# Altium PCB MiniPC.PcbDoc (part 13 of 24)
Units mm, origin at the board's own origin, x right, y up, seen from the top; angles counter-clockwise.
Board outline 175 x 155 mm, 16 copper layers (1_Top, 2_int1_(gnd), 3_int2_(power), 4_int3_(gnd), 5_int4_(sign), 6_int5_(power), 7_int6_(sign), 8_int7_(power), 9_int8_(gnd), 10_int9_(sign), 11_int10_(gnd), 12_int11_(sign), 13_int12_(gnd), 14_int13_(power), 15_int14_(gnd), 16_Bottom), stack 2.008 mm thick; 1046 components, 837 nets, 6010 pads, 4009 vias.
Unrouted connection lines stored in the file: 564.
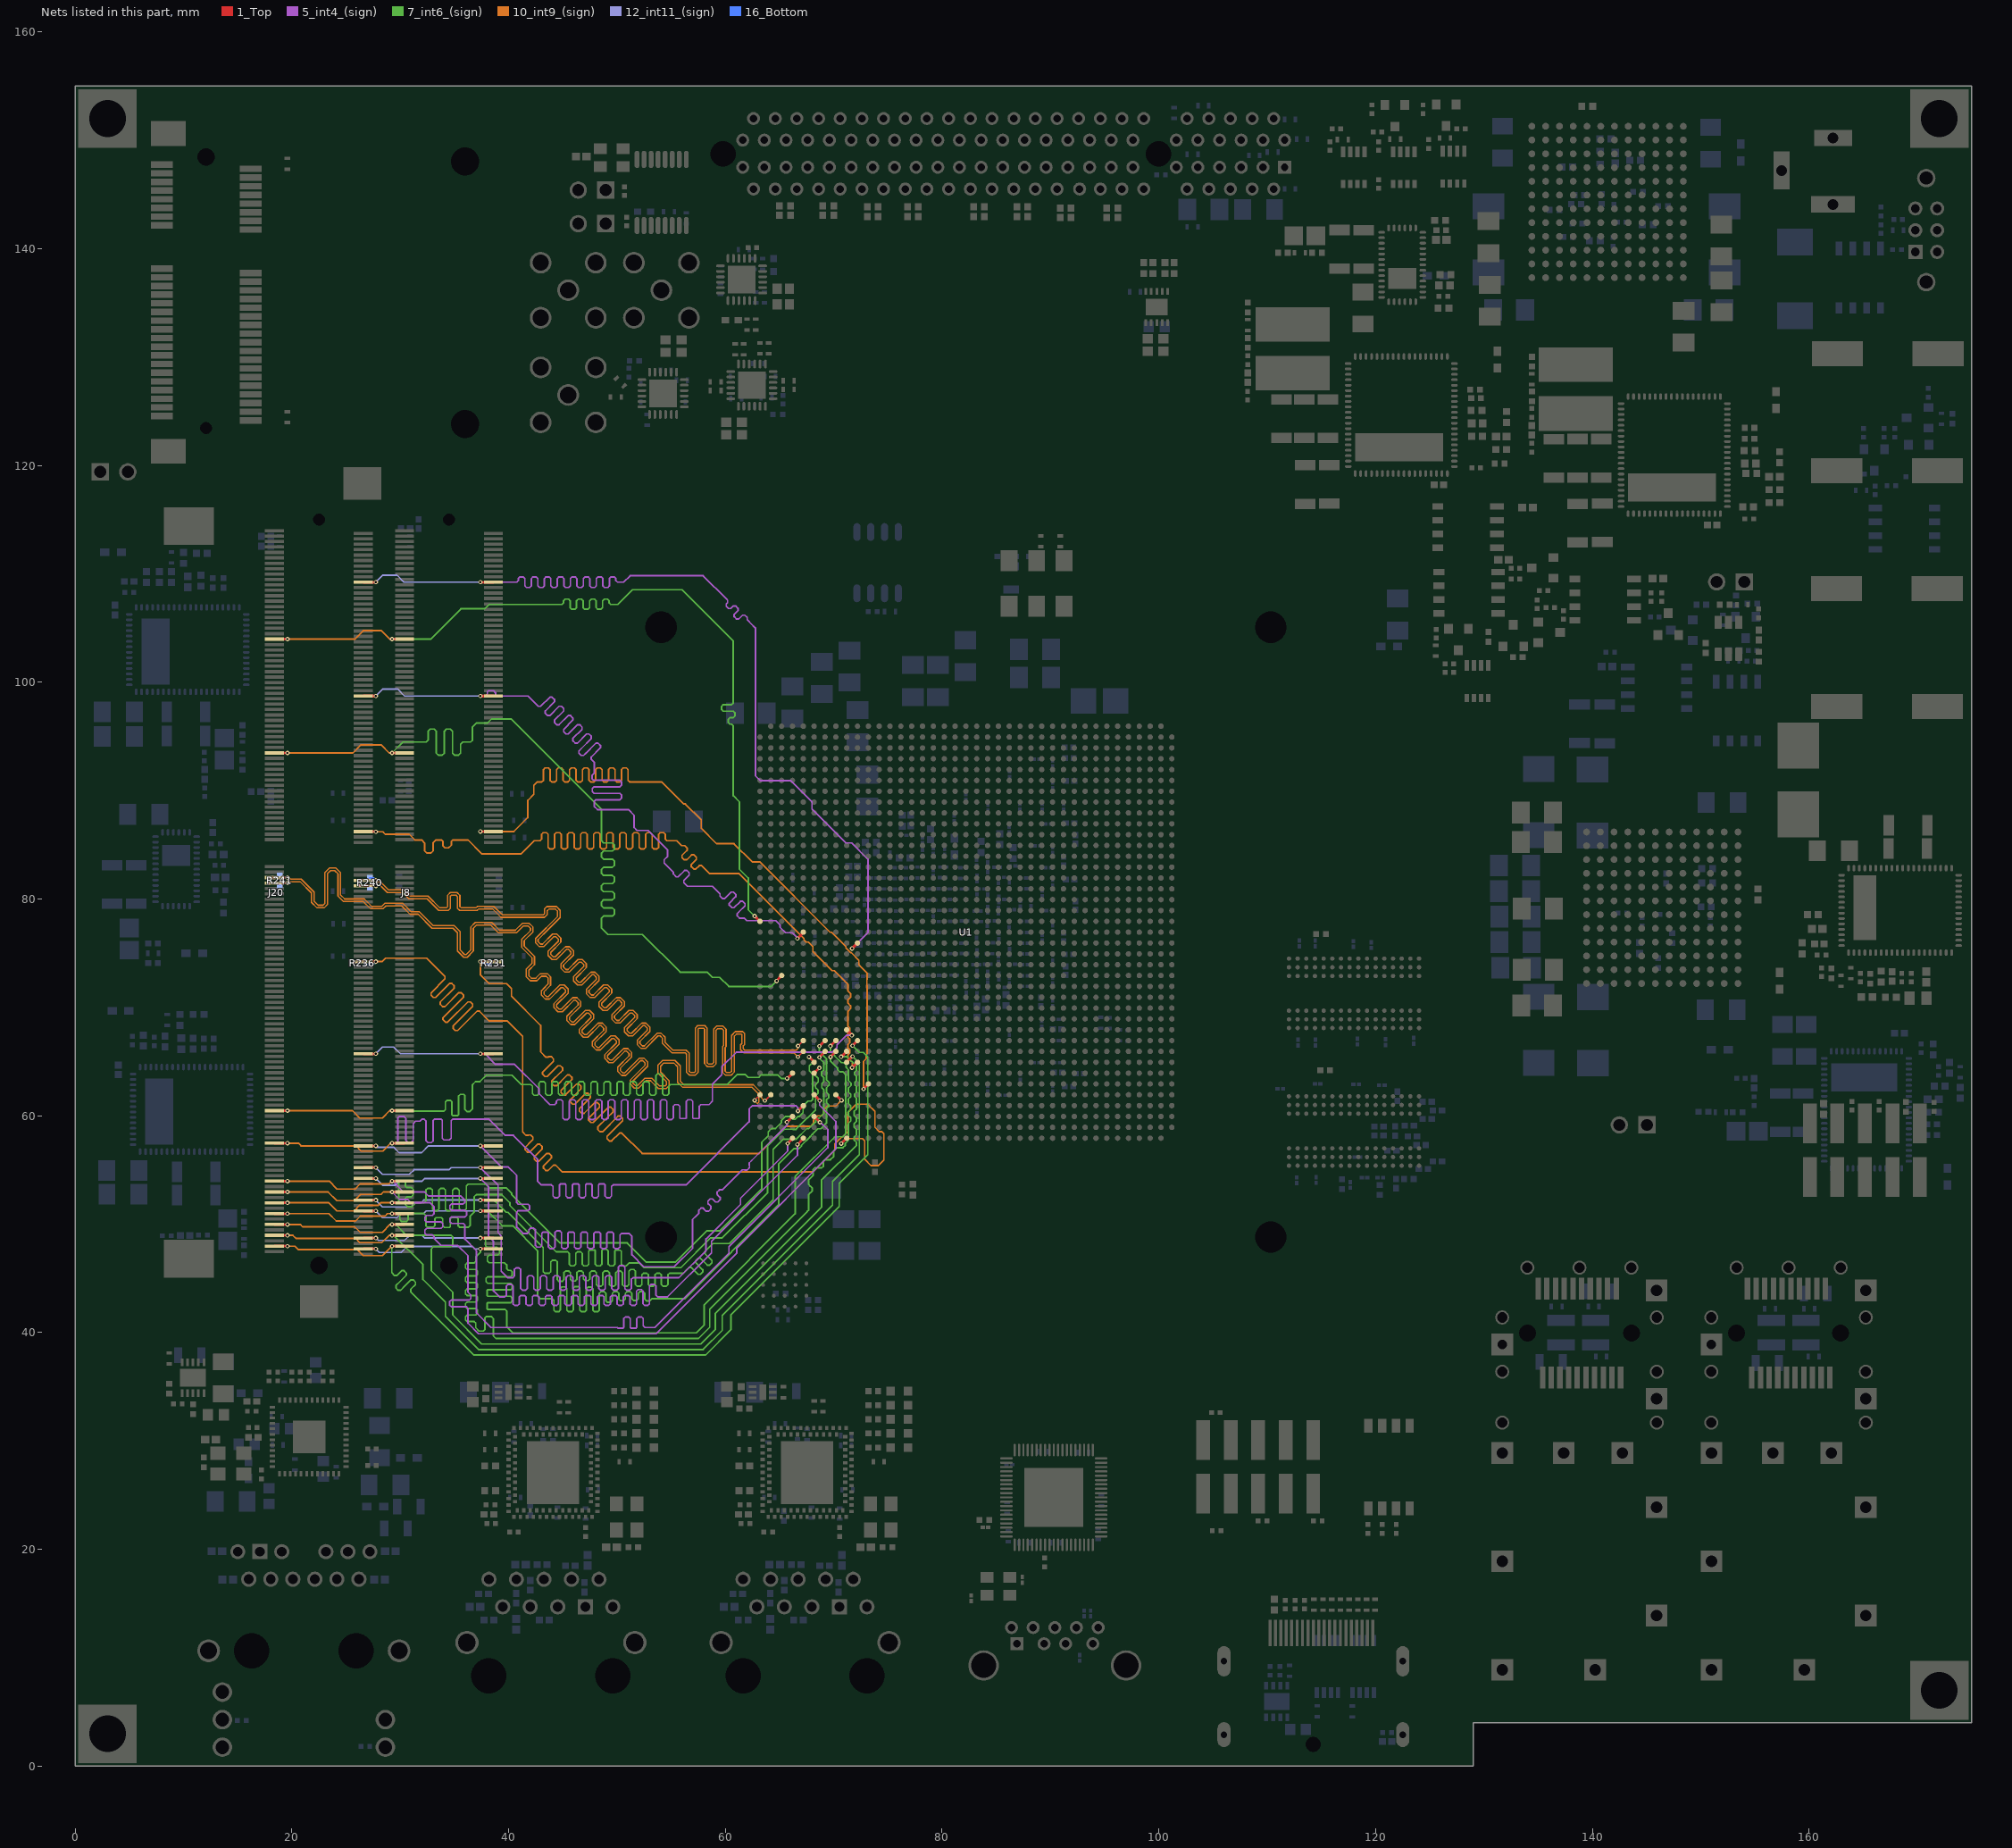
[diagram p25: the nets of this part, all layers, seen from the top]

## Via types
v1: diameter 0.4, hole 0.2, 1_Top to 16_Bottom, tented both sides, 1658 vias
v2: diameter 0.5, hole 0.2, 1_Top to 16_Bottom, tented both sides, 1014 vias
v3: diameter 0.7, hole 0.3, 1_Top to 16_Bottom, tented both sides, 915 vias
v4: diameter 0.6, hole 0.2, 1_Top to 16_Bottom, tented both sides, 278 vias
v5: diameter 0.4, hole 0.2, 1_Top to 16_Bottom, 93 vias
v6: diameter 0.4/0/0/0/0/0/0/0/0/0/0/0/0/0/0/0.4 (per signal layer), hole 0.2, 1_Top to 16_Bottom, tented both sides, 18 vias
v7: diameter 0.4/0/0/0/0/0/0/0/0/0/0/0.4/0.4/0.4/0.4/0.4 (per signal layer), hole 0.2, 1_Top to 16_Bottom, tented both sides, 16 vias
v8: diameter 0.5, hole 0.254, 1_Top to 16_Bottom, tented both sides, 15 vias
v9: diameter 0.5, hole 0.2, 1_Top to 16_Bottom, 2 vias

## Nets (pads, with @x,y where several pads share a name; then routed paths per layer and width w, separated by ;. In a path a pad name is that pad's centre, name@x,y a point inside that pad or via, vN(x,y) a via of type N, cw(c..) or ccw(c..) an arc to the next point about the centre after c; other vN are vias at no path point) (continued)
DDR4_SODIMM_CK2_N: J20.139 R240.2 U1.AK5 | length 103.1
  1_Top w0.15: J20.139@26.6,81.725 v1(27.75,81.725) ; v1(66.7,66.445) U1.AK5@67.194,66.939
  10_int9_(sign) w0.13: v1(27.75,81.725) 27.891,81.584 28.174,81.584 28.919,80.84 30.324,80.84 30.899,80.265 32.574,80.265 33.657,79.182 34.265,79.182 34.277,79.182 34.394,79.299 34.394,80.368 34.625,80.599 35.25,80.599 35.512,80.337 35.512,79.299 35.629,79.182 35.636,79.182 37,79.182 37.147,79.33 38.62,79.33 39.4,78.55 43.225,78.55 43.325,78.65 43.325,79.1 43.525,79.3 44.424,79.3 44.765,78.959 44.765,78.299 43.649,77.183 42.722,76.256 42.722,76.062 42.945,75.839 43.139,75.839 44.066,76.766 44.459,76.766 44.823,76.402 44.823,76.009 43.896,75.082 43.896,74.888 44.119,74.665 44.313,74.665 45.24,75.592 45.633,75.592 45.997,75.228 45.997,74.835 45.07,73.908 45.07,73.714 45.293,73.491 45.487,73.491 46.414,74.418 46.807,74.418 47.17,74.055 47.17,73.662 46.243,72.735 46.243,72.541 46.467,72.317 46.661,72.317 47.588,73.244 47.981,73.244 48.344,72.881 48.344,72.488 47.417,71.561 47.417,71.367 47.64,71.144 47.834,71.144 48.761,72.071 49.154,72.071 49.518,71.707 49.518,71.314 48.591,70.387 48.591,70.193 48.814,69.97 49.008,69.97 49.935,70.897 50.328,70.897 50.692,70.533 50.692,70.14 49.765,69.213 49.765,69.019 49.988,68.796 50.182,68.796 51.109,69.723 51.502,69.723 51.866,69.359 51.866,68.966 50.939,68.039 50.939,67.845 51.162,67.622 51.356,67.622 52.283,68.549 52.676,68.549 53.039,68.186 53.039,67.793 52.112,66.866 52.112,66.672 52.335,66.448 52.53,66.448 53.689,67.608 54.082,67.608 54.445,67.244 54.445,66.78 55.163,66.062 56.385,66.062 56.663,65.785 56.663,64.122 56.8,63.985 57.116,63.985 57.253,64.122 57.253,65.9 57.253,68.117 57.451,68.315 58.099,68.315 58.323,68.092 58.323,64.903 58.46,64.765 58.776,64.765 58.913,64.903 58.913,66.225 58.913,68.002 59.201,68.29 59.774,68.29 60.065,67.999 60.065,66.383 59.983,66.301 59.983,64.122 60.12,63.985 60.436,63.985 60.573,64.122 60.573,66.45 60.573,67.424 60.913,67.765 61.599,67.765 61.765,67.599 61.765,66.58 61.643,66.458 61.643,66.2 61.78,66.062 66.545,66.062 66.7,66.217 v1(66.7,66.445)
  16_Bottom w0.15: R240.2@27.2,81.925 27.55,81.925 v1(27.75,81.725)
DDR4_SODIMM_CK2_P: J20.137 R240.1 U1.AL5 | length 103
  1_Top w0.15: J20.137@26.6,81.225 26.625,81.25 26.671,81.204 v1(27.751,81.204) ; v1(66.694,65.439) U1.AL5@67.194,65.939
  10_int9_(sign) w0.13: v1(27.751,81.204) 27.892,81.344 28.075,81.344 28.819,80.6 30.225,80.6 30.8,80.025 32.475,80.025 33.558,78.942 34.441,78.942 34.634,79.135 34.634,80.269 34.725,80.359 35.151,80.359 35.272,80.238 35.272,79.155 35.485,78.942 37.099,78.942 37.247,79.09 38.521,79.09 39.301,78.31 43.324,78.31 43.565,78.551 43.565,78.91 43.715,79.06 44.325,79.06 44.525,78.86 44.525,78.398 42.482,76.355 42.482,75.963 42.846,75.599 43.239,75.599 44.166,76.526 44.36,76.526 44.583,76.303 44.583,76.109 43.656,75.182 43.656,74.789 44.019,74.425 44.412,74.425 45.339,75.352 45.534,75.352 45.757,75.129 45.757,74.935 44.83,74.008 44.83,73.615 45.193,73.251 45.586,73.251 46.513,74.178 46.707,74.178 46.93,73.955 46.93,73.761 46.003,72.834 46.003,72.441 46.367,72.077 46.76,72.077 47.687,73.004 47.881,73.004 48.104,72.781 48.104,72.587 47.177,71.66 47.177,71.267 47.541,70.904 47.934,70.904 48.861,71.831 49.055,71.831 49.278,71.608 49.278,71.413 48.351,70.486 48.351,70.094 48.715,69.73 49.108,69.73 50.035,70.657 50.229,70.657 50.452,70.434 50.452,70.24 49.525,69.313 49.525,68.92 49.888,68.556 50.281,68.556 51.208,69.483 51.402,69.483 51.626,69.26 51.626,69.066 50.699,68.139 50.699,67.746 51.062,67.382 51.455,67.382 52.382,68.309 52.576,68.309 52.799,68.086 52.799,67.892 51.872,66.965 51.872,66.572 52.236,66.208 52.629,66.208 53.788,67.368 53.982,67.368 54.205,67.144 54.205,66.68 55.063,65.822 56.286,65.822 56.423,65.685 56.423,64.023 56.701,63.745 57.215,63.745 57.493,64.023 57.493,65.9 57.493,68.018 57.55,68.075 58,68.075 58.083,67.992 58.083,64.803 58.361,64.525 58.875,64.525 59.153,64.803 59.153,66.225 59.153,67.903 59.3,68.05 59.675,68.05 59.825,67.9 59.825,66.482 59.743,66.4 59.743,64.023 60.021,63.745 60.535,63.745 60.813,64.023 60.813,66.45 60.813,67.325 61.013,67.525 61.5,67.525 61.525,67.5 61.525,66.68 61.403,66.558 61.403,66.1 61.681,65.822 66.311,65.822 v1(66.694,65.439)
  16_Bottom w0.15: R240.1@27.2,81.075 27.329,81.204 v1(27.751,81.204)
DDR4_SODIMM_CK3_N: J20.140 R241.2 U1.AR2 | length 103.1
  1_Top w0.15: J20.140@18.4,81.975 v1(19.602,81.975) ; v1(63.65,61.4) 63.655,61.4 U1.AR2@64.194,61.939
  10_int9_(sign) w0.13: v1(19.602,81.975) 19.765,81.975 19.9,81.84 20.86,81.84 22.05,80.65 22.05,79.8 22.425,79.425 22.885,79.425 23.06,79.6 23.06,82.449 23.476,82.865 24.06,82.865 24.5,82.425 24.5,80.375 24.875,80 26.7,80 27.361,79.339 28.314,79.339 28.585,79.61 30.229,79.61 30.999,78.84 31.749,78.84 33.045,77.545 34.974,77.545 35.525,76.994 35.525,75.3 35.95,74.875 36.086,74.875 36.504,75.294 36.504,77.404 36.94,77.84 38.449,77.84 39.174,77.115 40.626,77.115 41.276,77.765 41.899,77.765 42.258,77.407 42.258,76.983 41.439,76.164 41.439,75.65 42.39,74.699 42.39,73.94 41.875,73.425 41.875,72.925 42.1,72.7 42.511,72.7 42.926,73.115 43.574,73.115 43.875,72.814 43.875,72.05 43.425,71.6 43.425,71.589 43.264,71.428 43.264,71.234 43.487,71.011 43.681,71.011 44.739,72.068 45.132,72.068 45.495,71.705 45.495,71.312 44.438,70.254 44.438,70.06 44.661,69.837 44.855,69.837 45.913,70.894 46.306,70.894 46.669,70.531 46.669,70.138 45.612,69.08 45.612,68.886 45.835,68.663 46.029,68.663 47.086,69.721 47.479,69.721 47.843,69.357 47.843,68.964 46.786,67.907 46.786,67.713 47.009,67.489 47.203,67.489 48.26,68.547 48.653,68.547 49.017,68.183 49.017,67.79 47.959,66.733 47.959,66.539 48.182,66.316 48.377,66.316 49.434,67.373 49.827,67.373 50.191,67.009 50.191,66.616 49.133,65.559 49.133,65.365 49.356,65.142 49.55,65.142 50.608,66.199 51.001,66.199 51.364,65.836 51.364,65.443 50.307,64.385 50.307,64.191 50.53,63.968 50.724,63.968 52.085,65.328 52.477,65.328 52.841,64.965 52.841,64.572 51.481,63.211 51.481,63.017 51.704,62.794 51.898,62.794 52.576,63.472 53.203,63.472 53.925,62.75 54.45,62.75 54.575,62.875 54.575,63.136 53.778,63.932 53.778,64.674 54.219,65.115 55.349,65.115 55.84,64.624 55.84,63.2 56.175,62.865 62.574,62.865 63.315,62.124 63.315,61.675 63.59,61.4 v1(63.65,61.4)
  16_Bottom w0.15: R241.2@18.9,82.125 19.05,81.975 v1(19.602,81.975)
DDR4_SODIMM_CK3_P: J20.138 R241.1 U1.AR1 | length 103.2
  1_Top w0.15: J20.138@18.4,81.475 v1(19.602,81.475) ; v1(62.7,61.425) 62.7,61.445 U1.AR1@63.194,61.939
  10_int9_(sign) w0.13: v1(19.602,81.475) 19.727,81.6 20.761,81.6 21.81,80.551 21.81,79.701 22.326,79.185 22.984,79.185 23.3,79.501 23.3,82.35 23.575,82.625 23.961,82.625 24.26,82.326 24.26,80.276 24.776,79.76 26.601,79.76 27.262,79.099 28.413,79.099 28.684,79.37 30.13,79.37 30.9,78.6 31.65,78.6 32.945,77.305 34.875,77.305 35.285,76.895 35.285,75.201 35.851,74.635 36.185,74.635 36.744,75.194 36.744,77.305 37.039,77.6 38.35,77.6 39.075,76.875 40.725,76.875 41.375,77.525 41.8,77.525 42.018,77.307 42.018,77.082 41.199,76.264 41.199,75.551 42.15,74.6 42.15,74.039 41.635,73.524 41.635,72.826 42.001,72.46 42.61,72.46 43.025,72.875 43.475,72.875 43.635,72.715 43.635,72.149 43.185,71.699 43.185,71.688 43.024,71.527 43.024,71.134 43.388,70.771 43.781,70.771 44.838,71.828 45.032,71.828 45.255,71.605 45.255,71.411 44.198,70.354 44.198,69.961 44.562,69.597 44.955,69.597 46.012,70.654 46.206,70.654 46.429,70.431 46.429,70.237 45.372,69.18 45.372,68.787 45.735,68.423 46.128,68.423 47.186,69.481 47.38,69.481 47.603,69.258 47.603,69.063 46.546,68.006 46.546,67.613 46.909,67.249 47.302,67.249 48.36,68.307 48.554,68.307 48.777,68.084 48.777,67.89 47.719,66.832 47.719,66.439 48.083,66.076 48.476,66.076 49.533,67.133 49.727,67.133 49.951,66.91 49.951,66.716 48.893,65.658 48.893,65.265 49.257,64.902 49.65,64.902 50.707,65.959 50.901,65.959 51.124,65.736 51.124,65.542 50.067,64.485 50.067,64.092 50.431,63.728 50.824,63.728 52.184,65.088 52.378,65.088 52.601,64.865 52.601,64.671 51.241,63.311 51.241,62.918 51.604,62.554 51.997,62.554 52.675,63.232 53.104,63.232 53.826,62.51 54.549,62.51 54.815,62.776 54.815,63.235 54.018,64.032 54.018,64.575 54.318,64.875 55.25,64.875 55.6,64.525 55.6,63.101 56.076,62.625 62.475,62.625 63.075,62.025 63.075,61.25 62.95,61.125 62.7,61.375 v1(62.7,61.425)
  16_Bottom w0.15: R241.1@18.9,81.275 19.1,81.475 v1(19.602,81.475)
DDR4_SODIMM_CKE0: J8.109 R231.2 U1.AR8 | length 75.3
  1_Top w0.25: v1(37.398,74.225) J8.109@38.6,74.225 ; U1.AR8@70.194,61.939 70.708,61.425 v1(70.725,61.425)
  10_int9_(sign) w0.15: v1(37.398,74.225) 37.398,73.002 38.2,72.2 39.805,72.2 40.265,71.74 40.265,71.035 42.965,68.335 42.965,65.885 43.444,65.406 43.656,65.406 43.716,65.467 43.929,65.467 44.141,65.255 44.141,65.043 43.143,64.045 43.143,63.833 43.355,63.621 43.567,63.621 44.565,64.619 44.777,64.619 44.989,64.407 44.989,64.194 44.822,64.028 43.991,63.196 43.991,62.984 44.203,62.772 44.415,62.772 45.247,63.603 45.414,63.77 45.626,63.77 45.838,63.558 45.838,63.346 45.671,63.179 44.84,62.348 44.84,62.136 45.052,61.923 45.264,61.923 46.262,62.922 46.474,62.922 46.686,62.709 46.686,62.497 46.519,62.331 45.688,61.499 45.688,61.287 45.9,61.075 46.112,61.075 46.944,61.906 47.111,62.073 47.323,62.073 47.535,61.861 47.535,61.649 47.368,61.482 46.537,60.651 46.537,60.439 46.749,60.226 46.961,60.226 47.959,61.225 48.171,61.225 48.383,61.012 48.383,60.8 48.217,60.633 47.385,59.802 47.385,59.59 47.597,59.378 47.809,59.378 48.641,60.209 49.224,60.793 49.436,60.793 49.648,60.58 49.648,60.368 49.065,59.785 48.234,58.954 48.234,58.741 48.446,58.529 48.658,58.529 50.106,59.977 50.318,59.977 50.53,59.765 50.53,59.553 49.914,58.936 49.082,58.105 49.082,57.893 49.294,57.681 49.507,57.681 50.232,58.406 50.444,58.406 52.325,56.525 63.125,56.525 65.1,58.5 65.1,58.6 65.525,59.025 67.855,59.025 68.125,59.295 68.125,59.6 68.525,60 68.855,60 69.075,60.22 69.075,60.55 69.425,60.9 70.2,60.9 v1(70.725,61.425)
  16_Bottom w0.25: v1(37.398,74.225) 37.523,74.1 R231.2@38.175,74.1
DDR4_SODIMM_CKE1: J20.109 R236.2 U1.AW9 | length 103.2
  1_Top w0.25: J20.109@26.6,74.225 v1(27.75,74.225) ; v1(70.694,57.439) U1.AW9@71.194,57.939
  10_int9_(sign) w0.15: v1(27.75,74.225) 28.325,74.225 28.65,74.55 32.425,74.55 34.131,72.844 34.131,72.632 32.846,71.347 32.846,71.135 33.058,70.923 33.271,70.923 34.555,72.208 34.767,72.208 34.98,71.995 34.98,71.783 33.695,70.498 33.695,70.286 33.907,70.074 34.119,70.074 35.404,71.359 35.616,71.359 35.828,71.147 35.828,70.935 33.956,69.062 33.956,68.85 34.168,68.638 34.38,68.638 36.252,70.51 36.465,70.51 36.677,70.298 36.677,70.086 34.881,68.291 34.881,68.079 35.093,67.866 35.305,67.866 37.101,69.662 37.313,69.662 38.225,68.75 39.9,68.75 41.3,67.35 41.3,58.5 41.594,58.206 41.806,58.206 41.826,58.227 42.038,58.227 42.25,58.015 42.25,57.802 42.124,57.676 41.523,57.075 41.523,56.863 41.735,56.651 41.947,56.651 42.548,57.252 42.674,57.378 42.887,57.378 43.099,57.166 43.099,56.954 42.972,56.828 42.371,56.227 42.371,56.014 42.584,55.802 42.796,55.802 43.397,56.403 43.523,56.53 43.735,56.53 43.947,56.317 43.947,56.105 43.821,55.979 43.22,55.378 43.22,55.166 43.432,54.954 43.644,54.954 44.139,55.449 44.351,55.449 44.98,54.82 68.074,54.82 70.125,56.87 70.125,57.45 70.739,58.064 70.849,58.064 71.3,58.515 71.3,60.3 72.075,61.075 73.125,61.075 73.8,60.4 73.8,58.95 74.225,58.525 74.45,58.525 74.625,58.35 74.625,55.925 74.1,55.4 73.45,55.4 72.85,56 72.85,57.7 72.65,57.9 71.155,57.9 v1(70.694,57.439)
  16_Bottom w0.25: R236.2@26.95,74.1 27.625,74.1 v1(27.75,74.225)
DDR4_SODIMM_CS0: J8.149 U1.AP11 | length 75.4
  1_Top w0.25: v1(37.398,86.225) J8.149@38.6,86.225 ; v1(72.75,62.473) 72.75,62.496 U1.AP11@73.194,62.939
  10_int9_(sign) w0.15: v1(37.398,86.225) 40.492,86.225 41.771,87.504 41.771,89.096 42.325,89.65 42.325,90.475 42.65,90.8 43.075,90.8 43.225,90.95 43.225,91.944 43.375,92.094 43.675,92.094 43.825,91.944 43.825,90.95 43.975,90.8 44.275,90.8 44.425,90.95 44.425,91.944 44.575,92.094 44.875,92.094 45.025,91.944 45.025,90.95 45.175,90.8 45.475,90.8 45.625,90.95 45.625,91.944 45.775,92.094 46.075,92.094 46.225,91.944 46.225,90.95 46.375,90.8 46.675,90.8 46.825,90.95 46.825,91.944 46.975,92.094 47.275,92.094 47.425,91.944 47.425,90.95 47.575,90.8 47.875,90.8 48.025,90.95 48.025,91.944 48.175,92.094 48.475,92.094 48.625,91.944 48.625,90.95 48.775,90.8 49.075,90.8 49.225,90.95 49.225,91.944 49.375,92.094 49.675,92.094 49.825,91.944 49.825,90.95 49.975,90.8 50.275,90.8 50.425,90.95 50.425,91.944 50.575,92.094 50.875,92.094 51.025,91.944 51.025,90.95 51.175,90.8 54.125,90.8 56.155,88.77 56.305,88.77 57.775,87.3 57.775,86.524 59.199,85.1 60.8,85.1 62.475,83.425 63.178,83.425 69.664,76.939 69.791,76.939 71.125,75.605 71.125,75.478 71.539,75.064 71.599,75.064 72.319,74.345 72.319,73.929 73.075,73.173 73.075,72.584 73.054,72.562 73.054,72.045 73.075,72.023 73.075,70.704 73.069,70.698 73.069,69.643 73.079,69.634 73.079,68.273 73.075,68.269 73.075,65.725 73,65.651 73,65.27 72.75,65.02 v1(72.75,62.473)
DDR4_SODIMM_CS1: J20.149 U1.AM10 | length 92.2
  1_Top w0.25: J20.149@26.6,86.225 26.625,86.25 26.671,86.204 v1(27.751,86.204) ; v1(71.694,64.439) U1.AM10@72.194,64.939
  10_int9_(sign) w0.15: v1(27.751,86.204) 28.396,86.204 28.625,85.975 30.825,85.975 31.35,85.45 31.975,85.45 32.25,85.175 32.25,84.45 32.45,84.25 32.85,84.25 33.05,84.45 33.05,85.2 33.3,85.45 33.8,85.45 33.95,85.3 33.95,84.9 34.125,84.725 34.475,84.725 34.725,84.975 34.725,85.325 34.85,85.45 36.25,85.45 37.525,84.175 41.175,84.175 42.375,85.375 42.9,85.375 43.05,85.525 43.05,85.975 43.2,86.125 43.5,86.125 43.65,85.975 43.65,84.775 43.8,84.625 44.1,84.625 44.25,84.775 44.25,85.975 44.4,86.125 44.7,86.125 44.85,85.975 44.85,84.775 45,84.625 45.3,84.625 45.45,84.775 45.45,85.975 45.6,86.125 45.9,86.125 46.05,85.975 46.05,84.775 46.2,84.625 46.5,84.625 46.65,84.775 46.65,85.975 46.8,86.125 47.1,86.125 47.25,85.975 47.25,84.775 47.4,84.625 47.7,84.625 47.85,84.775 47.85,85.975 48,86.125 48.3,86.125 48.45,85.975 48.45,84.775 48.6,84.625 48.9,84.625 49.05,84.775 49.05,85.975 49.2,86.125 49.5,86.125 49.65,85.975 49.65,84.775 49.8,84.625 50.1,84.625 50.25,84.775 50.25,85.975 50.4,86.125 50.7,86.125 50.85,85.975 50.85,84.775 51,84.625 51.3,84.625 51.45,84.775 51.45,85.975 51.6,86.125 51.9,86.125 52.05,85.975 52.05,84.775 52.2,84.625 52.5,84.625 52.65,84.775 52.65,85.975 52.8,86.125 53.1,86.125 53.25,85.975 53.25,84.775 53.4,84.625 53.7,84.625 53.85,84.775 53.85,85.975 54,86.125 54.3,86.125 54.45,85.975 54.45,85.525 54.6,85.375 55.525,85.375 55.979,84.921 56.045,84.921 56.257,84.921 56.469,84.709 56.469,84.496 56.436,84.464 56.012,84.039 56.012,83.827 56.224,83.615 56.436,83.615 56.861,84.039 56.893,84.072 57.106,84.072 57.318,83.86 57.318,83.648 57.285,83.615 56.861,83.191 56.861,82.979 57.073,82.767 57.285,82.767 57.603,83.085 57.815,83.085 58.56,82.34 61.265,82.34 67.25,76.355 67.25,76.245 67.47,76.025 67.655,76.025 68.075,75.605 68.075,75.175 69.865,73.385 70.04,73.385 71.319,72.106 71.319,71.506 71.55,71.275 71.55,70.931 71.319,70.7 71.319,70.381 71.55,70.15 71.55,69.881 71.319,69.65 71.319,69.269 71.3,69.25 71.3,68.275 71.475,68.1 71.475,67.8 71.3,67.625 71.3,67.25 71.478,67.072 71.478,66.753 71.35,66.626 ; 71.35,66.625 71.3,66.575 71.3,66.225 71.375,66.225 71.5,66.1 71.5,65.798 71.302,65.6 71.302,65.367 71.694,64.976 v1(71.694,64.439)
DDR4_SODIMM_DM0: J8.12 J20.12 U1.AL9 | length 87.5
  1_Top w0.25: J20.12@18.4,49.975 v1(19.602,49.975) ; v1(29.25,49.975) J8.12@30.4,49.975 ; v1(70.677,65.45) 70.705,65.45 U1.AL9@71.194,65.939
  7_int6_(sign) w0.15: v1(29.25,49.975) 29.575,49.975 30.575,48.975 34.7,48.975 34.85,48.825 34.85,48.125 34.65,47.925 33.075,47.925 32.875,47.725 32.875,45.7 34.85,43.725 34.85,41.629 37.524,38.955 57.744,38.955 59.07,40.281 59.07,41.745 68.875,51.55 68.875,54.05 72.104,57.279 72.104,57.55 72.1,57.55 71.875,57.775 71.875,58.021 72.104,58.25 72.104,58.721 71.875,58.95 71.875,59.271 72.104,59.5 72.104,59.8 71.875,60.029 71.875,60.4 72.075,60.6 72.104,60.6 72.104,61.6 72.1,61.6 71.925,61.775 71.925,61.996 72.104,62.175 72.104,62.7 72.1,62.7 71.95,62.85 71.95,63.097 72.104,63.25 72.104,63.622 71.9,63.825 71.9,63.997 72.104,64.2 72.104,64.566 71.22,65.45 v1(70.677,65.45)
  10_int9_(sign) w0.15: v1(19.602,49.975) 20.77,49.975 20.982,49.763 25.812,49.763 26.325,49.25 28.35,49.25 29.075,49.975 v1(29.25,49.975)
DDR4_SODIMM_DM1: J8.33 J20.33 U1.AW4 | length 80.7
  1_Top w0.25: J20.33@26.6,55.225 v1(27.75,55.225) ; v1(37.398,55.225) J8.33@38.6,55.225 ; v1(65.75,57.45) 66.194,57.894 U1.AW4@66.194,57.939
  5_int4_(sign) w0.15: v1(37.398,55.225) 39.025,53.598 39.025,49.225 39.325,48.925 39.325,45.675 39.945,45.055 40.225,45.055 40.375,45.055 40.525,45.205 40.525,45.811 40.675,45.961 40.975,45.961 41.125,45.811 41.125,45.055 41.125,44.069 41.275,43.919 41.575,43.919 41.725,44.069 41.725,45.055 41.725,45.101 41.875,45.251 42.175,45.251 42.325,45.101 42.325,45.055 42.325,44.069 42.475,43.919 42.775,43.919 42.925,44.069 42.925,45.055 42.925,45.101 43.075,45.251 43.375,45.251 43.525,45.101 43.525,45.055 43.525,44.069 43.675,43.919 43.975,43.919 44.125,44.069 44.125,45.055 44.125,45.101 44.275,45.251 44.575,45.251 44.725,45.101 44.725,45.055 44.725,44.069 44.875,43.919 45.175,43.919 45.325,44.069 45.325,45.055 45.325,45.101 45.475,45.251 45.775,45.251 45.925,45.101 45.925,45.055 45.925,44.069 46.075,43.919 46.375,43.919 46.525,44.069 46.525,45.055 46.525,45.101 46.675,45.251 46.975,45.251 47.125,45.101 47.125,45.055 47.125,44.069 47.275,43.919 47.575,43.919 47.725,44.069 47.725,45.055 47.725,45.101 47.875,45.251 48.175,45.251 48.325,45.101 48.325,45.055 48.325,44.069 48.475,43.919 48.775,43.919 48.925,44.069 48.925,45.055 48.925,45.101 49.075,45.251 49.375,45.251 49.525,45.101 49.525,45.055 49.525,44.069 49.675,43.919 49.975,43.919 50.125,44.069 50.125,45.055 50.125,46.041 50.275,46.191 50.575,46.191 50.725,46.041 50.725,45.055 50.725,44.069 50.875,43.919 51.175,43.919 51.325,44.069 51.325,44.905 51.475,45.055 53.6,45.055 55.697,45.055 58.212,47.57 58.212,48.637 61.4,51.825 61.4,52.4 65.75,56.75 v1(65.75,57.45)
  12_int11_(sign) w0.15: v1(27.75,55.225) 28.375,54.6 30.85,54.6 31.275,55.025 34.5,55.025 34.7,55.225 v1(37.398,55.225)
DDR4_SODIMM_DM2: J8.54 J20.54 U1.AN4 | length 83.7
  1_Top w0.25: J20.54@18.4,60.475 v1(19.602,60.475) ; v1(29.25,60.475) J8.54@30.4,60.475 ; v1(65.7,63.45) 65.725,63.45 66.214,63.939 U1.AN4@66.194,63.939
  7_int6_(sign) w0.15: v1(29.25,60.475) 29.3,60.425 34.025,60.425 34.175,60.575 34.175,61.275 34.325,61.425 34.625,61.425 34.775,61.275 34.775,60.1 34.85,60.025 35.3,60.025 35.375,60.1 35.375,61.8 35.55,61.975 35.85,61.975 35.975,61.85 35.975,60.575 36.15,60.4 36.425,60.4 36.65,60.625 36.65,62.85 36.95,63.15 37.353,63.15 37.953,63.75 40.325,63.75 41.188,62.887 42.05,62.887 42.2,62.737 42.2,62.047 42.35,61.897 42.65,61.897 42.8,62.047 42.8,63.011 42.95,63.161 43.25,63.161 43.4,63.011 43.4,62.047 43.55,61.897 43.85,61.897 44,62.047 44,63.011 44.15,63.161 44.45,63.161 44.6,63.011 44.6,62.047 44.75,61.897 45.05,61.897 45.2,62.047 45.2,63.011 45.35,63.161 45.65,63.161 45.8,63.011 45.8,62.047 45.95,61.897 46.25,61.897 46.4,62.047 46.4,63.011 46.55,63.161 46.85,63.161 47,63.011 47,62.047 47.15,61.897 47.45,61.897 47.6,62.047 47.6,63.011 47.75,63.161 48.05,63.161 48.2,63.011 48.2,62.047 48.35,61.897 48.65,61.897 48.8,62.047 48.8,63.011 48.95,63.161 49.25,63.161 49.4,63.011 49.4,62.047 49.55,61.897 49.85,61.897 50,62.047 50,63.011 50.15,63.161 50.45,63.161 50.6,63.011 50.6,62.047 50.75,61.897 51.05,61.897 51.2,62.047 51.2,63.011 51.35,63.161 51.65,63.161 51.8,63.011 51.8,62.047 51.95,61.897 52.25,61.897 52.4,62.047 52.4,63.011 52.55,63.161 52.85,63.161 53,63.011 53,62.047 53.15,61.897 53.45,61.897 53.6,62.047 53.6,63.728 53.75,63.878 54.05,63.878 54.2,63.728 54.2,62.047 54.35,61.897 54.65,61.897 54.8,62.047 54.8,62.737 54.95,62.887 60.162,62.887 61.078,63.803 61.85,63.803 62.103,63.55 63.075,63.55 63.3,63.775 64.825,63.775 65.15,63.45 v1(65.7,63.45)
  10_int9_(sign) w0.15: v1(19.602,60.475) 25.6,60.475 26.275,59.8 28.35,59.8 29.025,60.475 v1(29.25,60.475)
DDR4_SODIMM_DM3: J8.75 J20.75 U1.AJ9 | length 88.9
  1_Top w0.25: J20.75@26.6,65.725 v1(27.75,65.725) ; v1(37.398,65.725) J8.75@38.6,65.725 ; U1.AJ9@71.194,67.939 71.675,67.458 v1(71.675,67.425)
  5_int4_(sign) w0.15: v1(37.398,65.725) 37.825,65.725 38.8,64.75 40.55,64.75 42.8,62.5 42.8,62.05 43.813,61.037 44.25,61.037 44.4,61.187 44.4,61.337 44.55,61.487 44.85,61.487 45,61.337 45,59.811 45.15,59.661 45.45,59.661 45.6,59.811 45.6,61.337 45.75,61.487 46.05,61.487 46.2,61.337 46.2,59.811 46.35,59.661 46.65,59.661 46.8,59.811 46.8,61.337 46.95,61.487 47.25,61.487 47.4,61.337 47.4,59.811 47.55,59.661 47.85,59.661 48,59.811 48,61.337 48.15,61.487 48.45,61.487 48.6,61.337 48.6,59.811 48.75,59.661 49.05,59.661 49.2,59.811 49.2,61.337 49.35,61.487 49.65,61.487 49.8,61.337 49.8,59.811 49.95,59.661 50.25,59.661 50.4,59.811 50.4,61.337 50.55,61.487 50.85,61.487 51,61.337 51,59.811 51.15,59.661 51.45,59.661 51.6,59.811 51.6,61.337 51.75,61.487 52.05,61.487 52.2,61.337 52.2,59.811 52.35,59.661 52.65,59.661 52.8,59.811 52.8,61.337 52.95,61.487 53.25,61.487 53.4,61.337 53.4,59.811 53.55,59.661 53.85,59.661 54,59.811 54,61.337 54.15,61.487 54.45,61.487 54.6,61.337 54.6,59.811 54.75,59.661 55.05,59.661 55.2,59.811 55.2,60.887 55.35,61.037 55.65,61.037 55.8,60.887 55.8,59.811 55.861,59.75 56.339,59.75 56.4,59.811 56.4,61.337 56.55,61.487 56.85,61.487 57,61.337 57,59.811 57.061,59.75 57.539,59.75 57.6,59.811 57.6,60.887 57.75,61.037 58.495,61.037 58.8,61.342 58.8,62.925 59.675,63.8 59.675,64.529 61.011,65.865 69.865,65.865 70.3,66.3 70.3,66.555 71.17,67.425 v1(71.675,67.425)
  12_int11_(sign) w0.15: v1(27.75,65.725) 28.375,66.35 29.405,66.35 30.03,65.725 v1(37.398,65.725)
DDR4_SODIMM_DM4: J8.178 J20.178 U1.AD3 | length 86
  1_Top w0.25: J20.178@18.4,93.475 v1(19.602,93.475) ; v1(29.25,93.475) J8.178@30.4,93.475 ; v1(64.725,72.425) 64.725,72.47 U1.AD3@65.194,72.939
  7_int6_(sign) w0.15: v1(29.25,93.475) 30.25,94.475 32.387,94.475 32.575,94.663 32.575,95.488 32.762,95.675 33.137,95.675 33.325,95.488 33.325,93.463 33.512,93.275 33.887,93.275 34.075,93.463 34.075,95.488 34.262,95.675 34.637,95.675 34.825,95.488 34.825,93.463 35.012,93.275 35.387,93.275 35.575,93.463 35.575,94.288 35.762,94.475 36.5,94.475 36.675,94.65 36.675,95.875 37.025,96.225 38.05,96.225 38.435,96.61 40.234,96.61 41.787,95.057 48.575,88.269 48.575,85.362 48.763,85.175 49.585,85.175 49.772,84.987 49.772,84.612 49.585,84.425 48.763,84.425 48.575,84.237 48.575,83.862 48.763,83.675 49.585,83.675 49.772,83.487 49.772,83.112 49.585,82.925 48.763,82.925 48.575,82.737 48.575,82.362 48.763,82.175 49.585,82.175 49.772,81.987 49.772,81.612 49.585,81.425 48.763,81.425 48.575,81.237 48.575,80.862 48.763,80.675 49.585,80.675 49.772,80.487 49.772,80.112 49.585,79.925 48.763,79.925 48.575,79.737 48.575,79.362 48.763,79.175 49.585,79.175 49.772,78.987 49.772,78.612 49.585,78.425 48.763,78.425 48.575,78.237 48.575,77.3 49.15,76.725 52.35,76.725 55.825,73.25 58.325,73.25 58.8,72.775 59.475,72.775 60.315,71.935 64.235,71.935 v1(64.725,72.425)
  10_int9_(sign) w0.15: v1(19.602,93.475) 25.65,93.475 26.4,94.225 28.225,94.225 28.975,93.475 v1(29.25,93.475)
DDR4_SODIMM_DM5: J8.199 J20.199 U1.Y5 | length 89.6
  1_Top w0.25: J20.199@26.6,98.725 v1(27.75,98.725) ; v1(37.398,98.725) J8.199@38.6,98.725 ; v1(66.65,76.35) 67.194,76.894 U1.Y5@67.194,76.939
  5_int4_(sign) w0.15: v1(37.398,98.725) 37.875,98.725 38.05,98.9 38.05,99.115 38.15,99.215 38.61,99.215 38.8,99.025 38.8,98.825 38.9,98.725 41.792,98.725 42.747,97.77 42.959,97.77 43.808,98.619 44.02,98.619 44.232,98.407 44.232,98.195 43.383,97.346 43.383,97.134 43.596,96.922 43.808,96.922 44.656,97.77 44.868,97.77 45.081,97.558 45.081,97.346 44.232,96.498 44.232,96.285 44.444,96.073 44.656,96.073 45.505,96.922 45.717,96.922 45.929,96.71 45.929,96.498 45.081,95.649 45.081,95.437 45.293,95.225 45.505,95.225 46.353,96.073 46.565,96.073 46.778,95.861 46.778,95.649 45.929,94.801 45.929,94.588 46.141,94.376 46.353,94.376 47.202,95.225 47.414,95.225 47.626,95.013 47.626,94.801 46.672,93.846 46.495,93.669 46.495,93.457 46.707,93.245 46.919,93.245 47.096,93.422 48.05,94.376 48.263,94.376 48.475,94.164 48.475,93.952 47.626,93.104 47.626,92.891 47.9,92.617 47.9,91.607 47.693,91.4 47.693,91.1 47.843,90.95 50.263,90.95 50.413,90.8 50.413,90.5 50.263,90.35 47.88,90.35 47.73,90.2 47.73,89.9 47.88,89.75 50.263,89.75 50.413,89.6 50.413,89.3 50.263,89.15 48.05,89.15 47.9,89 47.9,88.55 48.2,88.25 51.05,88.25 51.575,87.725 51.575,86.6 51.85,86.325 52.875,86.325 54.675,84.525 54.675,83.95 54.35,83.625 54.35,83.325 55.211,82.464 55.211,82.31 55.482,82.039 55.636,82.039 56.237,82.64 56.449,82.64 56.661,82.428 56.661,82.216 56.166,81.721 56.166,81.509 56.5,81.175 57.234,81.175 58.8,81.175 59.511,80.464 59.511,80.285 59.757,80.039 59.936,80.039 60.537,80.64 60.749,80.64 60.961,80.428 60.961,80.216 60.36,79.615 60.36,79.436 60.605,79.191 60.784,79.191 61.385,79.792 61.597,79.792 61.809,79.58 61.809,79.368 61.208,78.767 61.094,78.652 61.094,78.44 61.306,78.228 61.518,78.228 61.527,78.236 61.739,78.236 61.975,78 64.669,78 65.035,77.634 65.035,77.407 65.551,76.891 66.184,76.891 66.65,76.425 v1(66.65,76.35)
  12_int11_(sign) w0.15: v1(27.75,98.725) 28.4,99.375 29.75,99.375 30.4,98.725 v1(37.398,98.725)
DDR4_SODIMM_DM6: J8.220 J20.220 U1.W1 | length 82.6
  1_Top w0.25: J20.220@18.4,103.975 v1(19.602,103.975) ; v1(29.25,103.975) J8.220@30.4,103.975 ; v1(62.7,78.425) 62.708,78.425 U1.W1@63.194,77.939
  7_int6_(sign) w0.15: v1(29.25,103.975) 32.8,103.975 35.6,106.775 37.8,106.775 38.2,107.175 44.775,107.175 44.925,107.175 45.075,107.325 45.075,107.515 45.225,107.665 45.525,107.665 45.675,107.515 45.675,107.175 45.675,106.885 45.825,106.735 46.125,106.735 46.275,106.885 46.275,107.175 46.275,107.515 46.425,107.665 46.725,107.665 46.875,107.515 46.875,107.175 46.875,106.885 47.025,106.735 47.325,106.735 47.475,106.885 47.475,107.175 47.475,107.515 47.625,107.665 47.925,107.665 48.075,107.515 48.075,107.175 48.075,106.885 48.225,106.735 48.525,106.735 48.675,106.885 48.675,107.175 48.675,107.515 48.825,107.665 49.125,107.665 49.275,107.515 49.275,107.325 49.425,107.175 49.875,107.175 50.075,107.175 50.113,107.213 51.425,108.525 56,108.525 60.725,103.8 60.725,98.5 60.725,98.075 60.575,97.925 59.809,97.925 59.659,97.775 59.659,97.475 59.809,97.325 60.725,97.325 60.875,97.175 60.875,96.875 60.725,96.725 60.43,96.725 60.28,96.575 60.28,96.275 60.43,96.125 60.575,96.125 60.725,95.975 60.725,95.825 60.725,89.525 61.3,88.95 61.3,82.75 62.112,81.937 62.112,79.012 v1(62.7,78.425)
  10_int9_(sign) w0.15: v1(19.602,103.975) 25.8,103.975 26.575,104.75 28.275,104.75 29.05,103.975 v1(29.25,103.975)
DDR4_SODIMM_DM7: J8.241 J20.241 U1.AA10 | length 91.2
  1_Top w0.25: J20.241@26.6,109.225 v1(27.75,109.225) ; v1(37.398,109.225) J8.241@38.6,109.225 ; v1(71.694,75.439) U1.AA10@72.194,75.939
  5_int4_(sign) w0.15: v1(37.398,109.225) 40.6,109.225 40.75,109.225 40.9,109.375 40.9,109.565 41.05,109.715 41.35,109.715 41.5,109.565 41.5,109.225 41.5,108.885 41.65,108.735 41.95,108.735 42.1,108.885 42.1,109.225 42.1,109.565 42.25,109.715 42.55,109.715 42.7,109.565 42.7,109.225 42.7,108.885 42.85,108.735 43.15,108.735 43.3,108.885 43.3,109.225 43.3,109.565 43.45,109.715 43.75,109.715 43.9,109.565 43.9,109.225 43.9,108.885 44.05,108.735 44.35,108.735 44.5,108.885 44.5,109.225 44.5,109.565 44.65,109.715 44.95,109.715 45.1,109.565 45.1,109.225 45.1,108.885 45.25,108.735 45.55,108.735 45.7,108.885 45.7,109.225 45.7,109.565 45.85,109.715 46.15,109.715 46.3,109.565 46.3,109.225 46.3,108.885 46.45,108.735 46.75,108.735 46.9,108.885 46.9,109.225 46.9,109.565 47.05,109.715 47.35,109.715 47.5,109.565 47.5,109.225 47.5,108.885 47.65,108.735 47.95,108.735 48.1,108.885 48.1,109.225 48.1,109.565 48.25,109.715 48.55,109.715 48.7,109.565 48.7,109.225 48.7,108.885 48.85,108.735 49.15,108.735 49.3,108.885 49.3,109.225 49.3,109.565 49.45,109.715 49.75,109.715 49.9,109.565 49.9,109.375 50.05,109.225 50.5,109.225 50.615,109.225 51.21,109.82 57.955,109.82 60.125,107.65 60.21,107.565 60.21,107.352 60.085,107.227 60.085,107.014 60.297,106.802 60.509,106.802 60.741,107.034 60.945,107.034 61.165,106.814 61.165,106.61 60.809,106.254 60.809,106.042 61.021,105.829 61.233,105.829 61.589,106.186 61.793,106.186 62.014,105.965 62.014,105.761 62.438,105.337 62.65,105.125 62.775,105 62.775,91.372 63.222,90.925 66.025,90.925 68,88.95 68,88.3 71.125,85.175 71.65,85.175 73.155,83.67 73.155,76.9 v1(71.694,75.439)
  12_int11_(sign) w0.15: v1(27.75,109.225) 28.4,109.875 29.7,109.875 30.35,109.225 v1(37.398,109.225)
DDR4_SODIMM_DQ0: J8.8 J20.8 U1.AM9 | length 81.4
  1_Top w0.25: J20.8@18.4,48.975 v1(19.602,48.975) ; v1(29.25,48.975) J8.8@30.4,48.975 ; U1.AM9@71.194,64.939 71.725,65.47 v1(71.725,65.475)
  7_int6_(sign) w0.15: v1(29.25,48.975) 29.3,48.925 29.325,48.925 29.325,49.046 32.1,46.271 32.1,44.9 34.175,42.825 34.175,41.5 37.23,38.445 57.955,38.445 59.715,40.205 59.715,41.588 69.888,51.761 69.888,53.962 72.354,56.427 72.354,64.85 71.729,65.475 v1(71.725,65.475)
  10_int9_(sign) w0.15: v1(19.602,48.975) 20.1,48.975 20.375,48.7 25.875,48.7 26.275,48.3 28.3,48.3 28.975,48.975 v1(29.25,48.975)
DDR4_SODIMM_DQ1: J8.7 J20.7 U1.AL8 | length 88.5
  1_Top w0.25: J20.7@26.6,48.725 v1(27.75,48.725) ; v1(37.398,48.725) J8.7@38.6,48.725 ; v1(69.7,65.425) 69.7,65.445 U1.AL8@70.194,65.939 U1.AL8@70.089,65.939
  7_int6_(sign) w0.15: v1@37.423,48.75 v1(37.398,48.725) 37.675,48.725 37.875,48.525 37.875,48.025 38.025,47.875 38.9,47.875 39.175,47.6 39.175,47.325 39,47.15 38.225,47.15 38.05,46.975 38.05,46.625 38.225,46.45 39.623,46.45 39.823,46.25 39.823,45.9 39.973,45.75 40.184,45.75 40.334,45.6 40.334,45.3 40.184,45.15 38.066,45.15 37.916,45 37.916,44.7 38.066,44.55 40.184,44.55 40.334,44.4 40.334,44.1 40.184,43.95 38.066,43.95 38.025,43.909 38.025,43.391 38.066,43.35 40.169,43.35 40.319,43.2 40.319,42.9 40.169,42.75 38.066,42.75 38.025,42.709 38.025,42.191 38.066,42.15 39.673,42.15 39.823,42 39.823,40.552 40.4,39.975 57.322,39.975 58.05,40.703 58.05,42.575 66.44,50.965 66.44,54.39 70.114,58.064 70.849,58.064 71.1,58.315 71.1,63.825 70.875,64.05 70.57,64.05 70.35,64.27 70.35,64.42 69.7,65.07 v1(69.7,65.425)
  12_int11_(sign) w0.15: v1(27.75,48.725) 27.975,48.5 30.4,48.5 30.9,49 32,49 32.275,48.725 v1(37.398,48.725)
DDR4_SODIMM_DQ2: J8.20 J20.20 U1.AM6 | length 87
  1_Top w0.25: J20.20@18.4,51.975 v1(19.602,51.975) ; v1(29.25,51.975) J8.20@30.4,51.975 ; v1(67.719,65.431) 68.194,64.956 U1.AM6@68.194,64.939
  7_int6_(sign) w0.15: v1(29.25,51.975) 29.275,52 29.725,52 29.875,52.15 29.875,53.85 30.025,54 30.325,54 30.475,53.85 30.475,53.525 30.625,53.375 31.05,53.375 31.2,53.225 31.2,52.7 31.025,52.525 30.6,52.525 30.475,52.4 30.475,51.825 30.675,51.625 31.1,51.625 31.475,52 32.225,52 32.375,52.15 32.375,53.15 32.525,53.3 32.825,53.3 32.975,53.15 32.975,51.4 33.125,51.25 33.425,51.25 33.575,51.4 33.575,53.15 33.725,53.3 34.025,53.3 34.175,53.15 34.175,51.4 34.325,51.25 34.625,51.25 34.825,51.45 34.825,53.125 35,53.3 35.275,53.3 35.45,53.125 35.45,51.425 35.6,51.275 35.95,51.275 36.1,51.425 36.1,53.525 36.275,53.7 37.875,53.7 38.225,53.35 39.775,53.35 40.3,52.825 40.3,52.725 44.75,48.275 50.946,48.275 52.721,46.5 55.4,46.5 58.3,49.4 59.498,49.4 63.35,53.252 63.35,57.55 63.95,58.15 63.95,58.525 64.25,58.825 64.625,58.825 65.175,59.375 65.175,59.575 65.55,59.95 65.925,59.95 66.175,59.7 66.475,59.7 66.725,59.95 66.85,59.95 67.175,60.275 67.175,60.625 67.375,60.825 67.375,61.125 67.612,61.362 67.913,61.362 68.05,61.5 68.05,63.875 67.75,64.175 67.75,64.6 68.05,64.9 68.05,65.1 v1(67.719,65.431)
  10_int9_(sign) w0.15: v1(19.602,51.975) 23.425,51.975 24.175,51.225 25.75,51.225 26.275,51.75 27.975,51.75 28.2,51.975 v1(29.25,51.975)
DDR4_SODIMM_DQ3: J8.21 J20.21 U1.AL7 | length 88.1
  1_Top w0.25: J20.21@26.6,52.225 v1(27.75,52.225) ; v1(37.398,52.225) J8.21@38.6,52.225 ; v1(68.675,65.4) 69.194,65.919 U1.AL7@69.194,65.939
  7_int6_(sign) w0.15: v1@37.448,52.175 v1(37.398,52.225) 38.65,52.225 39.775,51.1 39.93,51.1 43.2,47.83 43.2,45.625 43.345,45.48 43.6,45.48 43.75,45.48 43.9,45.63 43.9,46.524 44.05,46.674 44.35,46.674 44.5,46.524 44.5,45.48 44.5,44.875 44.65,44.725 44.95,44.725 45.1,44.875 45.1,45.48 45.1,45.53 45.25,45.68 45.55,45.68 45.7,45.53 45.7,45.48 45.7,44.912 45.85,44.762 46.15,44.762 46.3,44.912 46.3,45.48 46.3,45.53 46.45,45.68 46.75,45.68 46.9,45.53 46.9,45.48 46.9,44.949 47.05,44.799 47.35,44.799 47.5,44.949 47.5,45.48 47.5,45.53 47.65,45.68 47.95,45.68 48.1,45.53 48.1,45.48 48.1,44.436 48.25,44.286 48.55,44.286 48.7,44.436 48.7,45.48 48.7,45.53 48.85,45.68 49.15,45.68 49.3,45.53 49.3,45.48 49.3,44.436 49.45,44.286 49.75,44.286 49.9,44.436 49.9,45.48 49.9,45.53 50.05,45.68 50.35,45.68 50.5,45.53 50.5,45.48 50.5,44.436 50.65,44.286 50.95,44.286 51.1,44.436 51.1,45.48 51.1,45.678 51.25,45.828 51.55,45.828 51.7,45.678 51.7,45.48 51.7,44.436 51.85,44.286 52.15,44.286 52.3,44.436 52.3,45.33 52.45,45.48 52.75,45.48 52.9,45.33 52.9,44.436 53.05,44.286 53.35,44.286 53.5,44.436 53.5,45.33 53.65,45.48 53.95,45.48 54.1,45.33 54.1,44.436 54.25,44.286 54.55,44.286 54.7,44.436 54.7,45.33 54.85,45.48 55.3,45.48 55.9,45.48 56.111,45.48 56.323,45.692 56.642,46.01 56.854,46.01 57.486,45.378 57.698,45.378 57.91,45.59 57.91,45.803 57.278,46.435 57.278,46.647 57.49,46.859 57.702,46.859 58.334,46.227 58.546,46.227 58.759,46.439 58.759,46.651 58.126,47.283 58.126,47.495 58.445,47.813 58.856,48.225 60.375,48.225 64.41,52.26 64.41,56.91 65.325,57.825 66.52,57.825 67.52,58.825 67.7,58.825 68.35,59.475 68.35,59.555 68.57,59.775 68.63,59.775 69.075,60.22 69.075,62.425 68.9,62.6 68.9,62.95 69.075,63.125 69.075,63.55 68.875,63.75 68.875,64.025 69.075,64.225 69.075,64.925 68.675,65.325 v1(68.675,65.4)
  12_int11_(sign) w0.15: v1(27.75,52.225) 28.375,51.6 31,51.6 31.375,51.975 31.925,51.975 32.175,52.225 v1(37.398,52.225)
DDR4_SODIMM_DQ4: J8.4 J20.4 U1.AK10 | length 88
  1_Top w0.25: J20.4@18.4,47.975 v1(19.602,47.975) ; v1(29.25,47.975) J8.4@30.4,47.975 ; v1(71.725,66.47) U1.AK10@72.194,66.939
  7_int6_(sign) w0.15: v1(29.25,47.975) 29.225,47.95 29.225,45.525 29.481,45.269 29.693,45.269 30.14,45.716 30.352,45.716 30.564,45.504 30.564,45.292 30.011,44.739 29.606,44.333 29.606,44.121 29.818,43.909 30.03,43.909 30.436,44.314 30.989,44.867 31.201,44.867 31.413,44.655 31.413,44.443 30.966,43.996 30.966,43.784 36.815,37.935 58.167,37.935 60.525,40.294 60.525,41.66 70.5,51.635 70.5,53.775 73.15,56.425 73.15,65.43 72.73,65.85 72.345,65.85 v1(71.725,66.47)
  10_int9_(sign) w0.15: v1(19.602,47.975) 20.275,47.975 20.6,47.65 26.05,47.65 26.6,47.1 28.35,47.1 29.225,47.975 v1(29.25,47.975)
DDR4_SODIMM_DQ5: J8.3 J20.3 U1.AK8 | length 88.7
  1_Top w0.25: J20.3@26.6,47.725 v1(27.75,47.725) ; v1(37.398,47.725) J8.3@38.6,47.725 ; v1(69.694,66.439) U1.AK8@70.194,66.939
  7_int6_(sign) w0.15: v1(37.398,47.725) 37.398,47.4 36.975,46.977 36.975,46.575 36.825,46.425 36.175,46.425 36.025,46.275 36.025,45.975 36.175,45.825 36.975,45.825 37.125,45.675 37.125,45.375 36.975,45.225 36.175,45.225 36.025,45.075 36.025,44.775 36.175,44.625 36.975,44.625 37.125,44.475 37.125,44.175 36.975,44.025 36.175,44.025 36.025,43.875 36.025,43.575 36.175,43.425 36.975,43.425 37.125,43.275 37.125,42.975 36.975,42.825 36.175,42.825 36.025,42.675 36.025,42.375 36.175,42.225 36.975,42.225 37.125,42.075 37.125,41.775 36.975,41.625 36.175,41.625 36.025,41.475 36.025,41.175 36.175,41.025 36.825,41.025 36.975,40.875 36.975,40.45 37.275,40.15 37.675,40.15 37.825,40.3 37.825,41.375 37.925,41.475 38.425,41.475 38.6,41.3 38.6,39.7 38.835,39.465 57.533,39.465 58.56,40.492 58.56,42.16 67.557,51.157 67.557,51.182 67.69,51.315 67.69,52.625 67.69,52.75 67.84,52.9 67.853,52.9 68.003,53.05 68.003,53.35 67.853,53.5 67.84,53.5 67.69,53.65 67.69,53.8 67.69,54.115 68.1,54.525 68.1,55.05 68.25,55.2 68.9,55.2 69.05,55.35 69.05,55.825 69.175,55.95 69.7,55.95 70,56.25 70,56.775 70.289,57.064 70.849,57.064 71.069,57.284 71.069,57.469 71.35,57.75 71.35,59.3 71.575,59.525 71.575,59.825 71.35,60.05 71.35,60.4 71.55,60.6 71.55,60.95 71.35,61.15 71.35,61.555 71.575,61.78 71.575,61.975 71.35,62.2 71.35,62.564 71.6,62.814 71.6,63 71.35,63.25 71.35,64.247 71.15,64.447 71.15,64.68 70.93,64.9 70.697,64.9 70.075,65.522 70.075,65.58 69.694,65.961 v1(69.694,66.439)
  12_int11_(sign) w0.15: v1(27.75,47.725) 28.075,47.4 30.1,47.4 30.65,47.95 36.675,47.95 36.9,47.725 v1(37.398,47.725)
DDR4_SODIMM_DQ6: J8.16 J20.16 U1.AN6 | length 87
  1_Top w0.25: J20.16@18.4,50.975 v1(19.602,50.975) ; v1(29.25,50.975) J8.16@30.4,50.975 ; U1.AN6@68.194,63.939 68.194,63.944 v1(68.675,64.425)
  7_int6_(sign) w0.15: v1(29.25,50.975) 29.275,51 29.775,51 29.975,50.8 29.975,50.425 30.15,50.25 30.575,50.25 30.725,50.4 30.725,50.85 30.875,51 32.175,51 32.375,50.8 32.375,49.85 32.5,49.725 33.05,49.725 33.2,49.875 33.2,50.5 33.3,50.6 33.8,50.6 33.925,50.475 33.925,49.85 34.075,49.7 34.525,49.7 34.625,49.8 34.625,50.5 34.725,50.6 35.225,50.6 35.35,50.475 35.35,49.85 35.475,49.725 36.3,49.725 36.45,49.875 36.45,50.725 36.825,51.1 36.825,52.525 37.025,52.725 39.38,52.725 40.125,51.98 40.125,51.725 44.395,47.455 45.45,47.455 45.6,47.305 45.6,46.305 45.75,46.155 46.05,46.155 46.2,46.305 46.2,47.305 46.35,47.455 46.65,47.455 46.8,47.305 46.8,46.305 46.95,46.155 47.25,46.155 47.4,46.305 47.4,47.525 47.5,47.625 47.925,47.625 48,47.55 48,46.305 48.15,46.155 48.45,46.155 48.6,46.305 48.6,47.575 48.7,47.675 49.05,47.675 49.2,47.525 49.2,46.305 49.35,46.155 49.65,46.155 49.8,46.305 49.8,47.525 49.875,47.6 50.3,47.6 50.4,47.5 50.4,46.305 50.55,46.155 50.85,46.155 51.11,46.415 52.085,46.415 52.51,45.99 55.9,45.99 58.65,48.74 59.715,48.74 63.9,52.925 63.9,57.225 65.445,58.77 66.23,58.77 66.25,58.75 66.52,58.75 67.595,59.825 67.605,59.825 68.325,60.545 68.325,61.85 68.55,62.075 68.55,62.375 68.325,62.6 68.325,62.875 68.575,63.125 68.575,63.475 68.325,63.725 68.325,64.025 68.675,64.375 v1(68.675,64.425)
  10_int9_(sign) w0.15: v1(19.602,50.975) 23.425,50.975 24.1,50.3 25.875,50.3 26.325,50.75 28.6,50.75 28.825,50.975 v1(29.25,50.975)
DDR4_SODIMM_DQ7: J8.17 J20.17 U1.AK7 | length 88.2
  1_Top w0.25: J20.17@26.6,51.225 v1(27.75,51.225) ; v1(37.398,51.225) J8.17@38.6,51.225 ; v1(68.675,66.425) 69.189,66.939 U1.AK7@69.194,66.939
  7_int6_(sign) w0.15: v1(37.398,51.225) 38.05,51.225 39.425,49.85 40.385,49.85 42.675,47.56 42.675,43.4 42.95,43.125 43.275,43.125 43.575,43.125 44.025,43.125 44.175,42.975 44.175,42.075 44.325,41.925 44.625,41.925 44.775,42.075 44.775,43.125 44.775,44.065 44.925,44.215 45.225,44.215 45.375,44.065 45.375,43.125 45.375,42.075 45.525,41.925 45.825,41.925 45.975,42.075 45.975,43.125 45.975,44.102 46.125,44.252 46.425,44.252 46.575,44.102 46.575,43.125 46.575,42.075 46.725,41.925 47.025,41.925 47.175,42.075 47.175,43.125 47.175,44.04 47.325,44.19 47.625,44.19 47.775,44.04 47.775,43.125 47.775,42.075 47.925,41.925 48.225,41.925 48.375,42.075 48.375,43.125 48.375,43.626 48.525,43.776 48.825,43.776 48.975,43.626 48.975,43.125 48.975,42.946 49.125,42.796 49.425,42.796 49.575,42.946 49.575,43.125 49.575,43.626 49.725,43.776 50.025,43.776 50.175,43.626 50.175,43.125 50.175,43.09 50.325,42.94 50.625,42.94 50.775,43.09 50.775,43.125 50.775,43.626 50.925,43.776 51.225,43.776 51.375,43.626 51.375,43.125 51.525,42.975 51.825,42.975 51.975,43.125 51.975,43.626 52.125,43.776 52.425,43.776 52.575,43.626 52.575,43.125 52.575,43.078 52.725,42.928 53.025,42.928 53.175,43.078 53.222,43.125 56.25,43.125 64.92,51.795 64.92,55.545 66.35,56.975 66.805,56.975 67.025,57.195 67.025,57.28 67.82,58.075 67.83,58.075 68.05,58.295 68.05,58.305 68.545,58.8 68.8,58.8 69.325,59.325 69.325,60.65 69.525,60.85 69.525,61.025 69.325,61.225 69.325,61.475 69.55,61.7 69.55,61.95 69.325,62.175 69.325,62.575 69.575,62.825 69.575,63.075 69.325,63.325 69.325,65.28 68.675,65.93 v1(68.675,66.425)
  12_int11_(sign) w0.15: v1(27.75,51.225) 28.375,50.6 29.7,50.6 30.075,50.975 32.15,50.975 32.4,51.225 v1(37.398,51.225)
DDR4_SODIMM_DQ8: J8.28 J20.28 U1.AU6 | length 83.2
  1_Top w0.25: J20.28@18.4,53.975 v1(19.602,53.975) ; v1(29.25,53.975) J8.28@30.4,53.975 ; U1.AU6@68.194,59.939 68.194,59.931 v1(68.725,59.4)
  5_int4_(sign) w0.15: v1(29.25,53.975) 29.3,53.975 30.3,52.975 32.25,52.975 32.625,52.6 35.6,52.6 35.975,52.225 35.975,52.025 35.825,51.875 34.739,51.875 34.589,51.725 34.589,51.425 34.739,51.275 35.975,51.275 36.125,51.125 36.125,50.825 35.975,50.675 34.739,50.675 34.589,50.525 34.589,50.225 34.739,50.075 35.825,50.075 35.975,49.925 35.975,49.775 35.975,48.618 37.034,47.559 37.034,41.816 38.375,40.475 49.775,40.475 50.025,40.475 50.1,40.4 50.55,40.4 50.625,40.475 50.625,41.29 50.775,41.44 51.075,41.44 51.225,41.29 51.225,40.475 51.3,40.4 51.75,40.4 51.825,40.475 51.825,41.29 51.975,41.44 52.275,41.44 52.425,41.29 52.425,40.625 52.575,40.475 53.025,40.475 53.325,40.475 53.475,40.475 60.325,47.325 60.325,47.925 69.458,57.058 69.458,58.734 68.793,59.4 v1(68.725,59.4)
  10_int9_(sign) w0.15: v1(19.602,53.975) 23.45,53.975 24.175,53.25 25.85,53.25 26.325,53.725 28.975,53.725 29.225,53.975 v1(29.25,53.975)
DDR4_SODIMM_DQ9: J8.29 J20.29 U1.AW5 | length 80.9
  1_Top w0.25: J20.29@26.6,54.225 v1(27.75,54.225) ; v1(37.398,54.225) J8.29@38.6,54.225 ; v1(66.65,57.35) 67.194,57.894 U1.AW5@67.194,57.939
  5_int4_(sign) w0.15: v1(37.398,54.225) 38.15,53.473 38.15,48.875 38.612,48.413 38.612,43.838 39.15,43.3 39.5,43.3 39.65,43.3 39.8,43.45 39.8,44.296 39.95,44.446 40.25,44.446 40.4,44.296 40.4,43.3 40.4,42.664 40.55,42.514 40.85,42.514 41,42.664 41,43.3 41.109,43.409 41.491,43.409 41.6,43.3 41.6,42.664 41.75,42.514 42.05,42.514 42.2,42.664 42.2,43.3 42.309,43.409 42.691,43.409 42.8,43.3 42.8,42.664 42.95,42.514 43.25,42.514 43.4,42.664 43.4,43.3 43.509,43.409 43.891,43.409 44,43.3 44,42.664 44.15,42.514 44.45,42.514 44.6,42.664 44.6,43.3 44.709,43.409 45.091,43.409 45.2,43.3 45.2,42.664 45.35,42.514 45.65,42.514 45.8,42.664 45.8,43.3 45.909,43.409 46.291,43.409 46.4,43.3 46.4,42.664 46.55,42.514 46.85,42.514 47,42.664 47,43.3 47.109,43.409 47.491,43.409 47.6,43.3 47.6,42.664 47.75,42.514 48.05,42.514 48.2,42.664 48.2,43.3 48.309,43.409 48.691,43.409 48.8,43.3 48.8,42.664 48.95,42.514 49.25,42.514 49.4,42.664 49.4,43.3 49.509,43.409 49.891,43.409 50,43.3 50,42.664 50.15,42.514 50.45,42.514 50.6,42.664 50.6,43.3 50.709,43.409 51.091,43.409 51.2,43.3 51.2,42.664 51.35,42.514 51.65,42.514 51.8,42.664 51.8,43.3 51.8,43.829 51.95,43.979 52.25,43.979 52.4,43.829 52.4,43.3 52.4,42.664 52.55,42.514 52.85,42.514 53,42.664 53,43.3 53,44.296 53.15,44.446 53.45,44.446 53.6,44.296 53.6,43.45 53.75,43.3 53.8,43.3 54.664,43.3 58.722,47.359 58.722,48.426 66.65,56.354 v1(66.65,57.35)
  12_int11_(sign) w0.15: v1(27.75,54.225) 28.375,53.6 29.6,53.6 29.975,53.975 32.025,53.975 32.275,54.225 v1(37.398,54.225)
DDR4_SODIMM_DQ10: J8.41 J20.41 U1.AU4 | length 81.3
  1_Top w0.25: J20.41@26.6,57.225 v1(27.75,57.225) ; v1(37.398,57.225) J8.41@38.6,57.225 ; v1(65.675,59.425) 65.68,59.425 U1.AU4@66.194,59.939
  5_int4_(sign) w0.15: v1(37.398,57.225) 39.348,55.275 39.975,55.275 40.75,54.5 40.75,52.4 40.75,52.15 40.75,52 40.9,51.85 41.793,51.85 41.943,51.7 41.943,51.4 41.793,51.25 40.9,51.25 40.75,51.1 40.75,50.775 40.75,49.725 41.325,49.15 41.575,49.15 41.725,49.15 41.875,49.3 41.875,49.479 42.025,49.629 42.325,49.629 42.475,49.479 42.475,49.15 42.475,48.04 42.625,47.89 42.925,47.89 43.075,48.04 43.075,49.15 43.2,49.275 43.55,49.275 43.675,49.15 43.675,47.9 43.825,47.75 44.125,47.75 44.275,47.9 44.275,49.15 44.275,49.233 44.425,49.383 44.725,49.383 44.875,49.233 44.875,49.15 44.875,47.9 45.025,47.75 45.325,47.75 45.475,47.9 45.475,49.15 45.6,49.275 45.95,49.275 46.075,49.15 46.075,47.9 46.225,47.75 46.525,47.75 46.675,47.9 46.675,49.15 46.8,49.275 47.15,49.275 47.275,49.15 47.275,47.9 47.425,47.75 47.725,47.75 47.875,47.9 47.875,49.15 48,49.275 48.35,49.275 48.475,49.15 48.475,47.9 48.625,47.75 48.925,47.75 49.075,47.9 49.075,49.15 49.2,49.275 49.55,49.275 49.675,49.15 49.675,47.9 49.825,47.75 50.125,47.75 50.275,47.9 50.275,49 50.425,49.15 50.875,49.15 51.1,49.15 51.375,48.875 51.375,47.825 51.375,47.175 52.475,46.075 55.275,46.075 56.975,47.775 56.975,50.425 57.362,50.812 57.542,50.992 57.542,51.058 57.542,51.27 57.754,51.482 57.966,51.482 57.999,51.449 58.246,51.201 58.459,51.201 58.671,51.414 58.671,51.626 58.423,51.873 58.39,51.906 58.39,52.118 58.602,52.33 58.815,52.33 58.847,52.297 59.095,52.05 59.307,52.05 59.519,52.262 59.519,52.474 59.272,52.722 59.239,52.755 59.239,52.967 59.451,53.179 59.663,53.179 59.729,53.179 60.1,53.55 61.037,54.487 61.25,54.7 61.568,55.018 61.78,55.018 61.806,54.992 62.018,54.992 62.23,55.204 62.23,55.416 62.204,55.442 62.204,55.654 62.412,55.862 65.7,59.15 65.7,59.4 v1(65.675,59.425)
  12_int11_(sign) w0.15: v1(27.75,57.225) 27.875,57.1 29.4,57.1 29.9,56.6 31.975,56.6 32.6,57.225 v1(37.398,57.225)
DDR4_SODIMM_DQ11: J8.42 J20.42 U1.AT5 | length 83.3
  1_Top w0.25: J20.42@18.4,57.475 v1(19.602,57.475) ; v1(29.25,57.475) J8.42@30.4,57.475 ; v1(66.694,60.439) U1.AT5@67.194,60.939
  5_int4_(sign) w0.15: v1(29.25,57.475) 29.625,57.475 29.775,57.625 29.775,59.8 29.925,59.95 30.325,59.95 30.525,59.75 30.525,57.75 30.75,57.525 30.975,57.525 31.2,57.75 31.2,59.275 31.425,59.5 31.825,59.5 32.025,59.7 32.2,59.7 32.375,59.525 32.375,57.725 32.575,57.525 32.875,57.525 33.05,57.7 33.05,59.575 33.175,59.7 33.775,59.7 33.875,59.6 33.875,57.925 34.025,57.775 34.525,57.775 34.7,57.95 34.7,59.55 34.85,59.7 38.175,59.7 39.675,58.2 40.45,58.2 42.69,55.96 42.69,53.96 43.025,53.625 43.95,53.625 44.1,53.475 44.1,52.603 44.25,52.453 44.55,52.453 44.7,52.603 44.7,53.625 44.8,53.725 45.2,53.725 45.3,53.625 45.3,52.603 45.45,52.453 45.75,52.453 45.9,52.603 45.9,53.625 46,53.725 46.4,53.725 46.5,53.625 46.5,52.603 46.65,52.453 46.95,52.453 47.1,52.603 47.1,53.625 47.2,53.725 47.6,53.725 47.7,53.625 47.7,52.603 47.85,52.453 48.15,52.453 48.3,52.603 48.3,53.625 48.4,53.725 48.8,53.725 48.9,53.625 48.9,52.603 49.05,52.453 49.35,52.453 49.5,52.603 49.5,53.475 49.65,53.625 56.375,53.625 62.2,59.45 62.2,60.639 62.5,60.939 66.511,60.939 66.694,60.756 v1(66.694,60.439)
  10_int9_(sign) w0.15: v1(19.602,57.475) 20.6,57.475 20.85,57.225 25.925,57.225 26.4,56.75 28.4,56.75 29.125,57.475 v1(29.25,57.475)
DDR4_SODIMM_DQ12: J8.24 J20.24 U1.AR6 | length 85.3
  1_Top w0.25: J20.24@18.4,52.975 v1(19.602,52.975) ; v1(29.25,52.975) J8.24@30.4,52.975 ; U1.AR6@68.194,61.939 68.194,61.931 68.7,61.425 v1(68.7,61.4)
  5_int4_(sign) w0.15: v1(29.25,52.975) 29.95,52.275 30.7,52.275 31,51.975 32.775,51.975 33.112,51.637 33.112,51.4 33.112,50.962 32.962,50.812 32.425,50.812 32.275,50.662 32.275,50.362 32.425,50.212 33.112,50.212 33.775,50.212 33.925,50.062 33.925,49.762 33.775,49.612 33.112,49.612 32.425,49.612 32.275,49.462 32.275,49.163 32.425,49.013 32.962,49.013 33.112,48.863 33.112,48.713 33.775,48.05 35.3,48.05 36.25,47.1 36.25,43.9 36.25,43.724 36.374,43.6 36.524,43.45 36.524,43.15 36.374,43 36.25,43 34.702,43 34.552,42.85 34.552,42.55 34.702,42.4 36.1,42.4 36.25,42.25 36.25,41 36.25,40.875 37.235,39.89 53.611,39.89 61.062,47.341 61.062,47.813 70.2,56.95 70.2,59.475 69.585,60.09 69.58,60.09 68.7,60.97 v1(68.7,61.4)
  10_int9_(sign) w0.15: v1(19.602,52.975) 23.35,52.975 24.15,52.175 25.775,52.175 26.35,52.75 28.225,52.75 28.45,52.975 v1(29.25,52.975)